# Altium PCB PCI Express_16765X6890_64PIN_Low profile_Clear.PCBDOC (part 8 of 9)
Units mm, origin at the board's own origin, x right, y up, seen from the top; angles counter-clockwise.
Board outline 80.71 x 137.84 mm, 6 copper layers (Top Layer, Layer 2 (GND), Layer 3, Layer 4, Layer 5 (AGND), Bottom Layer), stack 1.571 mm thick; 507 components, 297 nets, 1544 pads, 616 vias.
Unrouted connection lines stored in the file: 101.
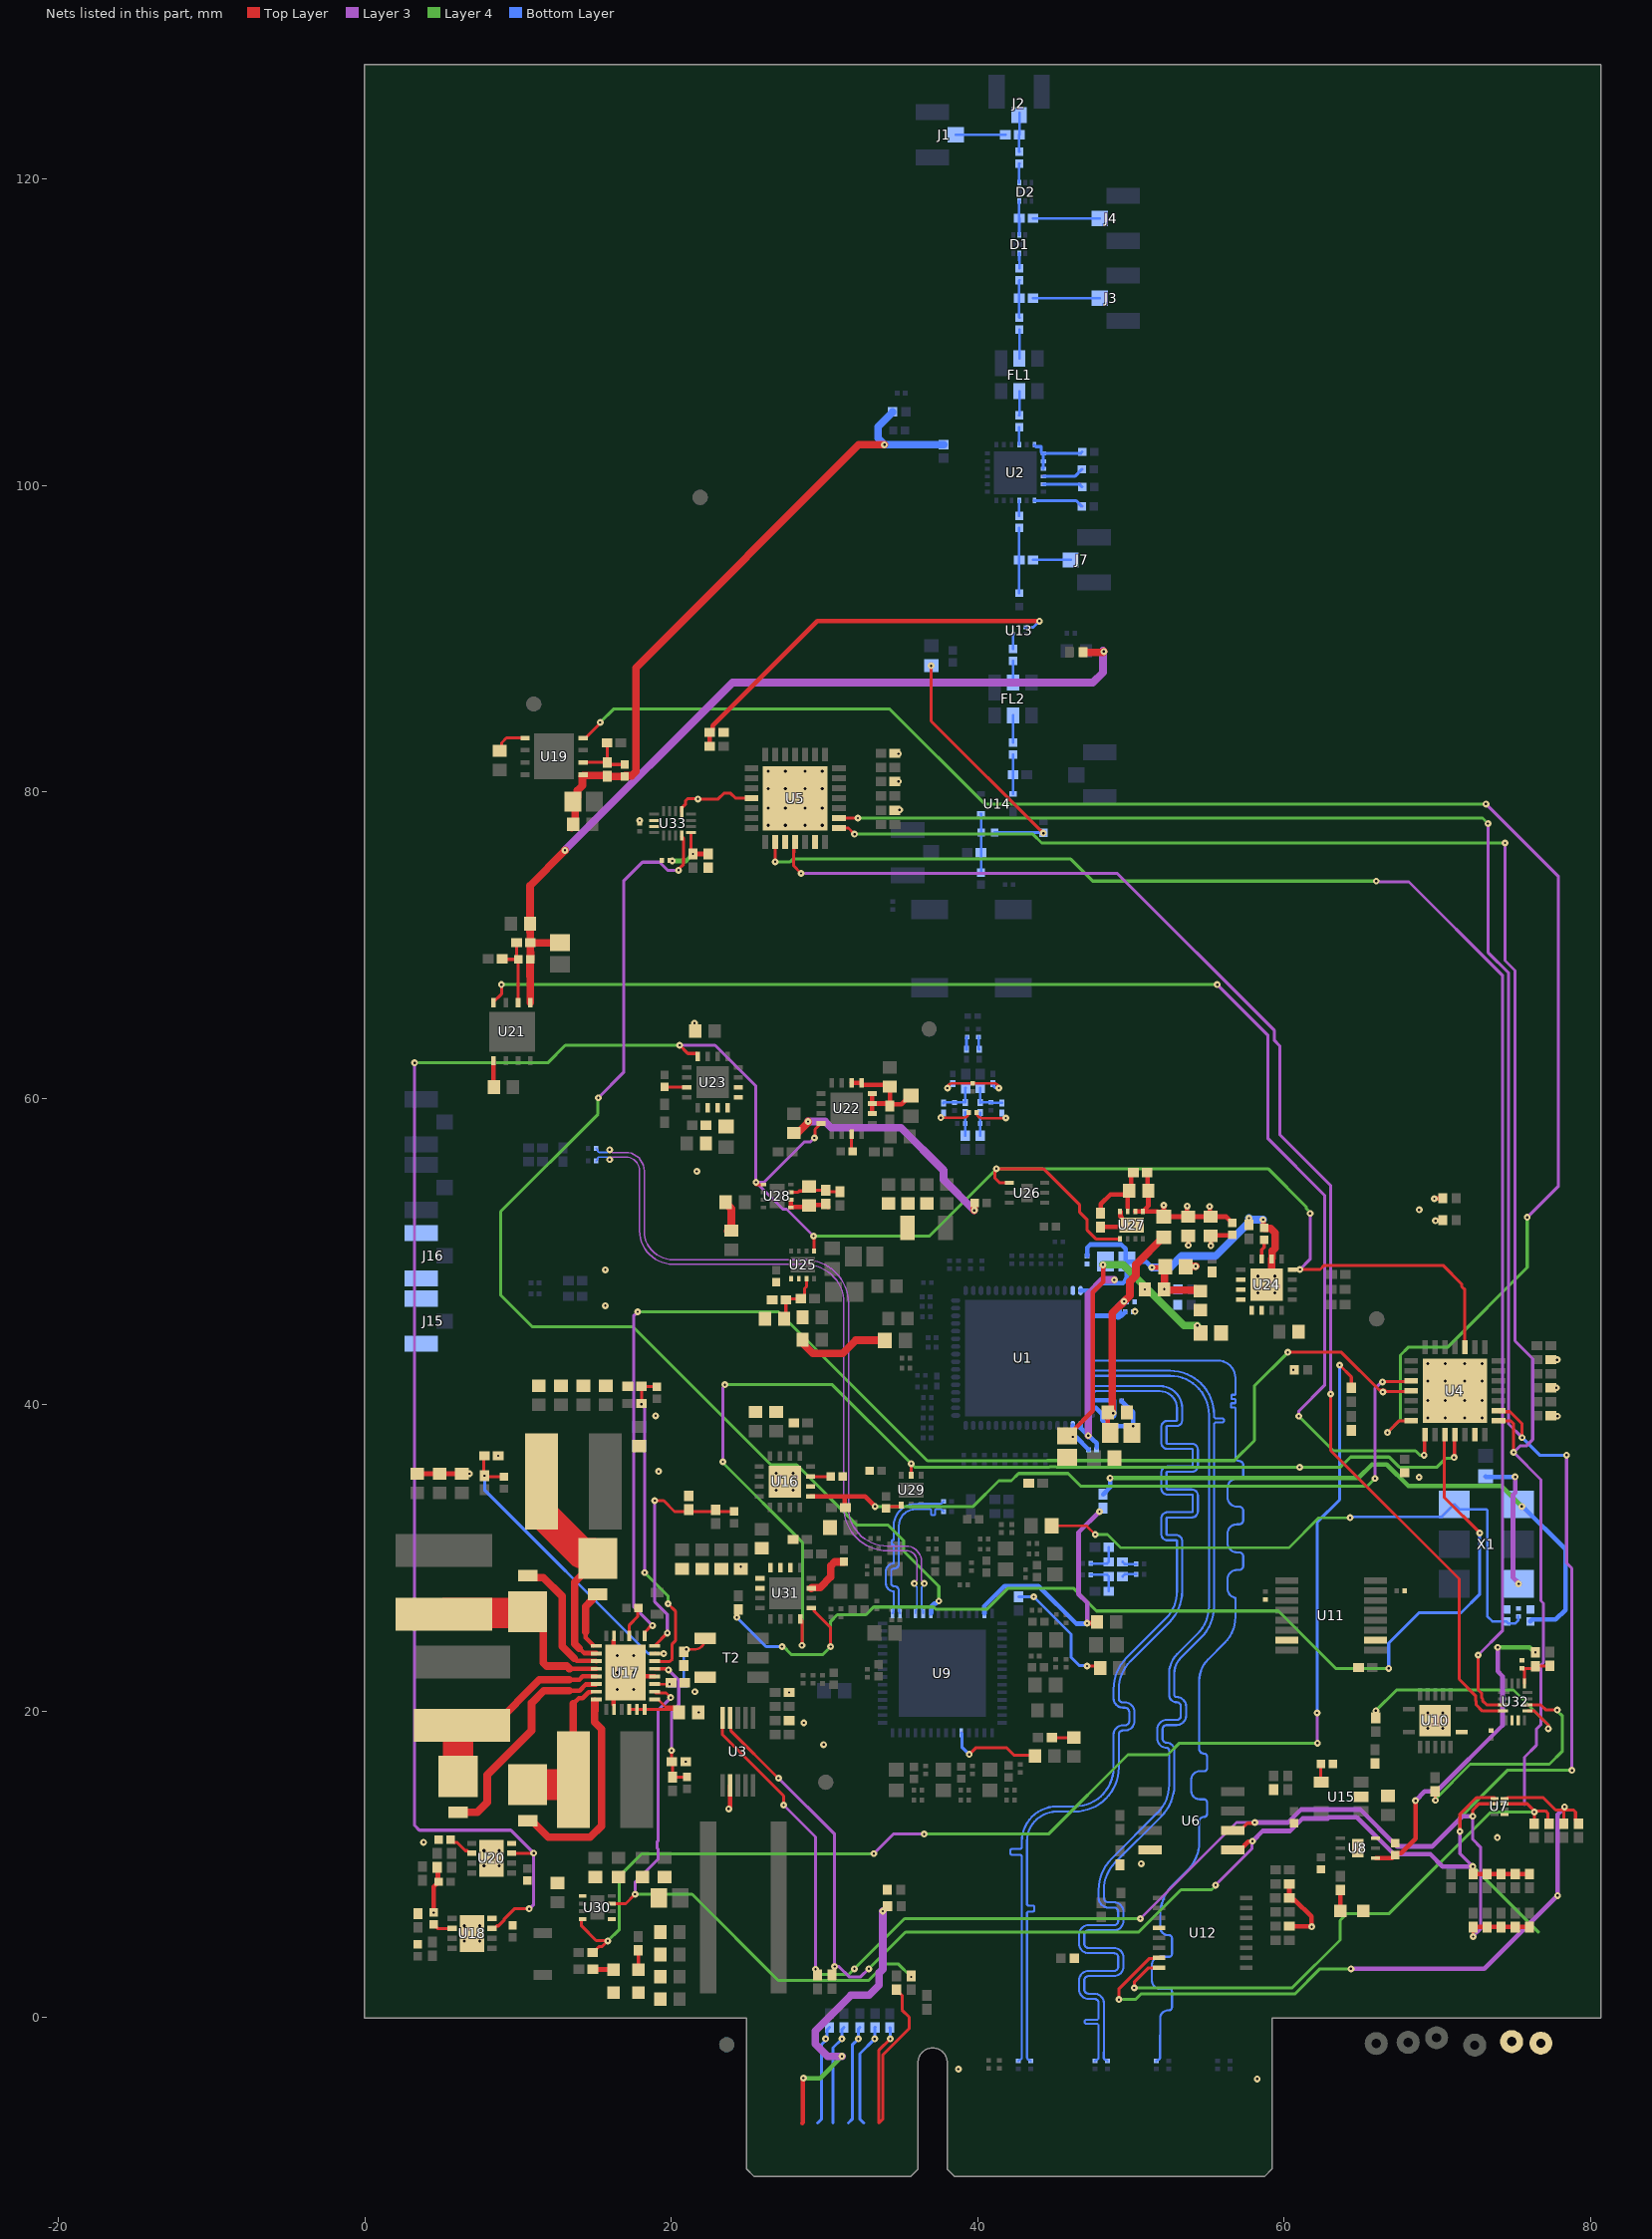
[diagram p6: the nets of this part, all layers, seen from the top]

## Via types
v1: diameter 0.45, hole 0.15, Top Layer to Bottom Layer, 469 vias
v2: diameter 0.5, hole 0.2, Top Layer to Bottom Layer, 128 vias
v3: diameter 0.475, hole 0.15, Top Layer to Bottom Layer, 15 vias
v4: diameter 5, hole 3, Top Layer to Bottom Layer, 3 vias
v5: diameter 0.6, hole 0.2, Top Layer to Bottom Layer, 1 vias

## Nets (pads, with @x,y where several pads share a name; then routed paths per layer and width w, separated by ;. In a path a pad name is that pad's centre, name@x,y a point inside that pad or via, vN(x,y) a via of type N, cw(c..) or ccw(c..) an arc to the next point about the centre after c; other vN are vias at no path point) (continued)
CMLout2_P: C18.1 U1.25 | length 66.1
  Bottom Layer w0.138: U1.25@47.363,42.792 47.499,42.792 ccw(c47.499,42.93) 47.597,42.832 cw(c47.695,42.734) 47.695,42.873 55.679,42.873 cw(c55.679,41.732) 56.82,41.732 56.82,41.238 56.82,40.913 56.82,40.693 cw(c56.765,40.693) 56.765,40.638 56.611,40.638 ccw(c56.611,40.583) 56.556,40.583 56.556,40.418 ccw(c56.611,40.418) 56.611,40.363 56.765,40.363 cw(c56.765,40.308) 56.82,40.308 56.82,40.143 cw(c56.765,40.143) 56.765,40.087 56.585,40.087 ccw(c56.585,40.032) 56.53,40.032 56.53,39.867 ccw(c56.585,39.867) 56.585,39.812 56.765,39.812 cw(c56.765,39.757) 56.82,39.757 56.82,39.675 56.82,36.558 ccw(c57.055,36.558) 57.055,36.322 cw(c57.055,36.043) 57.334,36.043 57.334,35.447 cw(c57.055,35.447) 57.055,35.168 56.922,35.168 ccw(c56.922,34.552) 56.306,34.552 56.306,33.956 ccw(c56.922,33.956) 56.922,33.34 57.055,33.34 cw(c57.055,33.061) 57.334,33.061 57.334,32.465 cw(c57.055,32.465) 57.055,32.186 56.922,32.186 ccw(c56.922,31.57) 56.306,31.57 56.306,30.974 ccw(c56.922,30.974) 56.922,30.358 57.055,30.358 cw(c57.055,30.079) 57.334,30.079 57.334,29.483 cw(c57.055,29.483) 57.055,29.204 56.922,29.204 ccw(c56.922,28.588) 56.306,28.588 56.306,27.991 ccw(c56.922,27.991) 56.82,27.384 56.82,26.137 cw(c54.416,26.137) 56.116,24.437 55.026,23.347 ccw(c56.398,21.975) 54.458,21.975 54.458,17.531 ccw(c54.768,17.531) 54.768,17.221 cw(c54.768,17.017) 54.972,17.017 54.972,16.272 cw(c54.768,16.272) 54.768,16.068 54.485,16.068 ccw(c54.485,15.526) 53.943,15.526 53.943,14.781 ccw(c54.485,14.781) 54.485,14.239 54.768,14.239 cw(c54.768,14.035) 54.972,14.035 54.972,13.289 cw(c54.768,13.289) 54.768,13.085 ccw(c54.768,12.775) 54.458,12.775 54.458,11.435 cw(c51.918,11.435) 53.714,9.639 52.751,8.677 ccw(c54.782,6.646) 51.91,6.646 51.91,5.884 ccw(c52.428,5.884) 52.428,5.366 52.498,5.366 cw(c52.498,5.186) 52.678,5.186 52.678,4.139 cw(c52.498,4.139) 52.498,3.959 51.89,3.959 ccw(c51.89,3.441) 51.373,3.441 51.373,2.394 ccw(c51.89,2.394) 51.89,1.876 52.498,1.876 cw(c52.498,1.696) 52.678,1.696 52.678,0.649 cw(c52.498,0.649) 52.498,0.469 52.428,0.469 ccw(c52.428,-0.049) 51.91,-0.049 51.91,-1.152 51.901,-1.161 51.901,-2.62 cw(c51.764,-2.62) 51.861,-2.717 51.847,-2.731 cw(c51.783,-2.666) 51.783,-2.758 ccw(c51.783,-2.849) 51.718,-2.784 C18.1@51.664,-2.839
CMLout3_N: C233.1 U1.26 | length 66
  Bottom Layer w0.138: U1.26@47.363,42.292 47.557,42.292 47.638,42.21 52.553,42.21 cw(c52.553,39.333) 55.43,39.333 55.43,39.243 55.43,39.188 55.513,39.105 55.996,39.105 56.079,39.023 56.079,38.913 55.996,38.83 55.513,38.83 55.43,38.748 55.43,37.084 55.43,26.831 cw(c52.558,26.831) 54.589,24.8 53.249,23.46 ccw(c54.255,22.454) 52.832,22.454 52.832,21.064 ccw(c52.984,21.064) 52.984,20.912 cw(c52.984,20.295) 53.6,20.295 53.6,19.699 cw(c52.984,19.699) 52.984,19.083 52.342,19.083 ccw(c52.342,18.804) 52.064,18.804 52.064,18.208 ccw(c52.342,18.208) 52.342,17.929 cw(c52.342,17.44) 52.832,17.44 52.832,15.165 cw(c49.96,15.165) 51.991,13.134 48.979,10.122 ccw(c50.775,8.326) 48.235,8.326 48.235,7.791 ccw(c48.513,7.791) 48.513,7.513 48.895,7.513 cw(c48.895,6.896) 49.511,6.896 49.511,6.3 cw(c48.895,6.3) 48.895,5.684 47.237,5.684 ccw(c47.237,5.405) 46.958,5.405 46.958,4.809 ccw(c47.237,4.809) 47.237,4.53 48.895,4.53 cw(c48.895,3.914) 49.511,3.914 49.511,3.318 cw(c48.895,3.318) 48.895,2.702 47.237,2.702 ccw(c47.237,2.423) 46.958,2.423 46.958,1.827 ccw(c47.237,1.827) 47.237,1.548 47.618,1.548 cw(c47.618,0.932) 48.235,0.932 48.235,-2.269 48.226,-2.278 48.226,-2.62 ccw(c48.363,-2.62) 48.266,-2.717 48.279,-2.731 ccw(c48.344,-2.666) 48.344,-2.758 cw(c48.344,-2.849) 48.409,-2.784 C233.1@48.463,-2.839
CMLout3_P: C234.1 U1.27 | length 66
  Bottom Layer w0.138: U1.27@47.363,41.792 47.557,41.792 47.638,41.873 52.553,41.873 cw(c52.553,39.333) 55.093,39.333 55.093,26.833 cw(c52.553,26.833) 54.349,25.037 53.008,23.697 ccw(c54.249,22.456) 52.494,22.456 52.494,21.064 ccw(c52.984,21.064) 52.984,20.574 cw(c52.984,20.295) 53.263,20.295 53.263,19.699 cw(c52.984,19.699) 52.984,19.42 52.342,19.42 ccw(c52.342,18.804) 51.726,18.804 51.726,18.208 ccw(c52.342,18.208) 52.342,17.592 cw(c52.342,17.44) 52.494,17.44 52.494,15.167 cw(c49.954,15.167) 51.75,13.371 48.738,10.359 ccw(c50.769,8.328) 47.897,8.328 47.897,7.791 ccw(c48.513,7.791) 48.513,7.175 48.895,7.175 cw(c48.895,6.896) 49.173,6.896 49.173,6.3 cw(c48.895,6.3) 48.895,6.021 47.237,6.021 ccw(c47.237,5.405) 46.621,5.405 46.621,4.809 ccw(c47.237,4.809) 47.237,4.193 48.895,4.193 cw(c48.895,3.914) 49.173,3.914 49.173,3.318 cw(c48.895,3.318) 48.895,3.039 47.237,3.039 ccw(c47.237,2.423) 46.621,2.423 46.621,1.827 ccw(c47.237,1.827) 47.237,1.21 47.618,1.21 cw(c47.618,0.932) 47.897,0.932 47.897,0.102 47.897,-0.064 47.814,-0.146 47.066,-0.146 46.983,-0.229 46.983,-0.339 47.066,-0.421 47.814,-0.421 47.897,-0.504 47.897,-0.559 47.897,-2.13 47.888,-2.139 47.888,-2.62 cw(c47.75,-2.62) 47.848,-2.717 47.834,-2.731 cw(c47.77,-2.666) 47.77,-2.758 ccw(c47.77,-2.849) 47.705,-2.784 C234.1@47.65,-2.839
CMLout4_N: C235.1 U1.28 | length 66.1
  Bottom Layer w0.138: C235.1@43.459,-2.839 43.405,-2.784 ccw(c43.34,-2.849) 43.34,-2.758 cw(c43.34,-2.666) 43.276,-2.731 43.262,-2.717 cw(c43.359,-2.62) 43.222,-2.62 43.222,2.404 43.217,2.408 43.217,5.512 43.217,6.788 cw(c43.335,6.788) 43.335,6.906 43.58,6.906 ccw(c43.58,7.023) 43.697,7.023 43.697,7.18 ccw(c43.58,7.18) 43.58,7.297 43.335,7.297 cw(c43.335,7.415) 43.217,7.415 43.217,7.493 43.217,11.493 cw(c45.161,11.493) 45.161,13.437 46.33,13.437 ccw(c46.33,16.314) 49.207,16.314 49.207,18.466 cw(c49.469,18.466) 49.469,18.727 49.613,18.727 ccw(c49.613,19.343) 50.229,19.343 50.229,19.94 ccw(c49.613,19.94) 49.613,20.556 49.486,20.556 cw(c49.486,20.835) 49.207,20.835 49.207,21.434 cw(c51.747,21.434) 49.951,23.23 52.506,25.785 ccw(c50.476,27.816) 53.347,27.816 53.347,31.089 ccw(c52.955,31.089) 52.955,31.481 52.38,31.481 cw(c52.38,31.536) 52.325,31.536 52.325,32.58 cw(c52.38,32.58) 52.38,32.635 53.977,32.635 ccw(c53.977,33.027) 54.37,33.027 54.37,34.071 ccw(c53.977,34.071) 53.977,34.463 52.38,34.463 cw(c52.38,34.518) 52.325,34.518 52.325,35.562 cw(c52.38,35.562) 52.38,35.617 53.977,35.617 ccw(c53.977,36.009) 54.37,36.009 54.37,37.053 ccw(c53.977,37.053) 53.977,37.446 52.38,37.446 cw(c52.38,37.5) 52.325,37.5 52.325,38.544 cw(c52.38,38.544) 52.38,38.599 52.955,38.599 ccw(c52.955,38.992) 53.347,38.992 53.347,39.751 ccw(c51.888,39.751) 51.888,41.21 47.695,41.21 cw(c47.695,41.349) 47.597,41.251 ccw(c47.499,41.153) 47.499,41.292 U1.28@47.363,41.292
CMLout4_P: C236.1 U1.29 | length 66.1
  Bottom Layer w0.138: C236.1@42.647,-2.839 42.701,-2.784 cw(c42.766,-2.849) 42.766,-2.758 ccw(c42.766,-2.666) 42.83,-2.731 42.844,-2.717 ccw(c42.747,-2.62) 42.884,-2.62 42.875,2.388 42.88,2.392 42.88,10.414 42.88,10.492 ccw(c42.762,10.492) 42.762,10.61 42.252,10.61 cw(c42.252,10.727) 42.135,10.727 42.135,10.884 cw(c42.252,10.884) 42.252,11.001 42.762,11.001 ccw(c42.762,11.119) 42.88,11.119 42.88,11.176 42.88,11.493 cw(c45.161,11.493) 45.161,13.774 46.33,13.774 ccw(c46.33,16.314) 48.87,16.314 48.87,18.466 cw(c49.469,18.466) 49.469,19.065 49.613,19.065 ccw(c49.613,19.343) 49.892,19.343 49.892,19.94 ccw(c49.613,19.94) 49.613,20.218 49.486,20.218 cw(c49.486,20.835) 48.87,20.835 48.87,21.437 cw(c51.741,21.437) 49.711,23.467 52.266,26.022 ccw(c50.47,27.818) 53.01,27.818 53.01,31.089 ccw(c52.955,31.089) 52.955,31.143 52.38,31.143 cw(c52.38,31.536) 51.988,31.536 51.988,32.58 cw(c52.38,32.58) 52.38,32.972 53.977,32.972 ccw(c53.977,33.027) 54.032,33.027 54.032,34.071 ccw(c53.977,34.071) 53.977,34.126 52.38,34.126 cw(c52.38,34.518) 51.988,34.518 51.988,35.562 cw(c52.38,35.562) 52.38,35.954 53.977,35.954 ccw(c53.977,36.009) 54.032,36.009 54.032,37.053 ccw(c53.977,37.053) 53.977,37.108 52.38,37.108 cw(c52.38,37.5) 51.988,37.5 51.988,38.544 cw(c52.38,38.544) 52.38,38.937 52.955,38.937 ccw(c52.955,38.992) 53.01,38.992 53.01,39.751 ccw(c51.888,39.751) 51.888,40.873 47.695,40.873 ccw(c47.695,40.734) 47.597,40.832 cw(c47.499,40.93) 47.499,40.792 U1.29@47.363,40.792
CTRL_VCXO: C222.1 R89.1 U9.41 | length 17.5
  Top Layer w0.3: v1(47.142,25.73) 47.706,25.73 C222.1@47.784,25.808
  Layer 3 w0.3: v1(47.142,25.73) 47.142,27.065 46.582,27.626 46.582,31.647 v1(47.955,33.02)
  Bottom Layer w0.3: U9.41@40.437,26.372 40.437,26.848 41.746,28.157 43.979,28.157 46.457,25.679 46.479,25.702 47.114,25.702 v1(47.142,25.73)
DCDC_PG1: U4.25 U17.23 | length 82.8
  Top Layer w0.2: U17.23@18.26,24.905 18.26,25.13 18.707,25.578 v1(18.771,25.578) ; v1(60.249,43.409) 63.748,43.409 66.204,40.953 v1@66.573,40.953 ; v1(66.446,40.818) 66.484,40.856 68.257,40.856 U4.25@68.295,40.894
  Layer 3 w0.2: v1(17.805,46.05) 17.534,45.779 17.534,26.814 v1(18.771,25.578)
  Layer 4 w0.2: v1(17.805,46.05) 27,46.05 36.72,36.33 44.522,36.33 44.539,36.347 56.756,36.347 58.064,37.656 58.064,41.224 v1(60.249,43.409) ; v1(18.771,25.578) v1@18.807,25.614
DCDC_PG2: R83.1 R136.2 U30.8 | length 84.9
  Top Layer w0.2: U30.8@14.214,6.425 14.17,6.425 14.145,6.4 14.145,5.978 15.101,5.023 15.827,5.023 v1(15.855,4.994) 15.484,4.623 15.289,4.623 14.908,4.242 R83.1@14.858,4.242 R83.1@14.883,4.217 ; v1(63.627,42.57) 64.389,41.808 R136.2@64.389,41.09
  Layer 3 w0.2: v1(33.223,10.693) 34.493,11.963 v1(36.5,11.963) ; v1(62.154,19.872) 62.166,19.859 62.166,17.92 v1(62.179,17.907)
  Layer 4 w0.2: v1@15.768,4.907 v1(15.855,4.994) 16.612,5.75 16.612,9.22 18.059,10.668 33.198,10.668 v1(33.223,10.693) ; v1(36.5,11.963) 44.622,11.963 49.804,17.145 52.4,17.145 53.162,17.907 v1(62.179,17.907)
  Bottom Layer w0.2: v1(62.154,19.872) 62.154,32.315 63.627,33.788 v1(63.627,42.57)
DGND: C85.1 C86.1 C87.1 C88.1 C89.1 C90.1 C91.1 FB35.2 R70.1 U1.16 U1.33 U24.6 U24.17 | length 42.7
  Top Layer w0.3: v1(51.373,48.946) 52.182,48.946 52.197,48.961 FB35.2@52.233,48.997 ; R70.1@57.709,51.725 v1(57.709,52.172) ; v1(58.623,52.07) 58.652,52.041 58.652,51.568 C87.1@58.699,51.52
  Top Layer w0.5: FB35.2@52.197,48.961 52.197,47.559 v1(52.179,47.541) C86.1@52.162,47.523 52.217,47.468 54.478,47.468 C85.1@54.534,47.412 ; C87.1@58.699,51.52 58.699,51.515 58.719,51.495 59.126,51.495 59.419,51.202 59.419,50.209 59.227,50.016 59.227,49.553 U24.6@59.177,49.503 59.177,48.153 U24.17@58.852,47.828
  Layer 3 w0.5: v1(47.219,37.973) 47.219,47.183 48.178,48.142 v1(48.918,48.142)
  Bottom Layer w0.3: U1.33@46.713,38.642 46.713,38.492 46.741,38.463 46.741,38.45 v1(47.219,37.973) 47.777,37.49 C88.1@47.777,37.206 ; U1.16@46.713,47.442 47.391,47.442 47.879,47.93 49.479,47.93 49.657,48.108 49.657,48.173 49.736,48.252 C90.1@49.736,49.352 ; C89.1@47.142,49.694 47.152,49.694 47.152,50.251 47.346,50.444 49.378,50.444 49.657,50.165 49.657,49.431 C90.1@49.736,49.352 ; v1(51.373,48.946) 50.992,49.327 49.762,49.327 C90.1@49.736,49.352
  Bottom Layer w0.5: v1(51.373,48.946) 52.565,48.946 53.317,49.697 54.509,49.697 54.512,49.693 55.499,49.693 57.709,51.903 v1(57.709,52.172) 57.81,52.07 v1(58.623,52.07)
  other v2: 58.302,47.278 59.402,47.278 58.302,48.378 59.402,48.378
DRGND: C127.1 C128.1 C129.1 C130.1 C132.1 C133.1 C134.1 C135.1 FB5.1 FB6.1 FB7.1 FB8.1 FB9.1 FB35.1 FB36.1 R74.1 U1.18 U1.31 U27.4 U27.9 | length 13.4
  Top Layer w0.3: R74.1@48.017,51.587 49.911,51.587 v1(50.038,51.714) 49.738,51.714 49.388,52.064 49.388,52.219 49.313,52.294 49.313,52.589 U27.4@49.288,52.614 ; v1(53.746,50.394) 53.746,51.01 C129.1@53.749,51.012 ; v1(55.22,50.368) 55.22,51.006 C130.1@55.213,51.012 55.246,51.046 56.583,51.046 C128.1@56.617,51.079 ; v1(69.799,53.442) 69.817,53.46 70.34,53.46 FB7.1@70.358,53.478 ; v1(69.875,51.994) 69.899,52.017 70.334,52.017 FB8.1@70.358,52.041
  Top Layer w0.5: FB35.1@53.583,48.997 53.609,49.022 v1(54.229,49.022)
  Bottom Layer w0.3: U1.31@47.363,39.792 47.72,39.792 48.133,39.379 48.133,38.97 48.52,38.583 v1(50.14,38.583) 50.14,39.493 49.409,40.224 C134.1@49.409,40.234
  other v1: 60.604,42.266 50.267,46.076 68.817,52.71
DRVDD_1.25V: C127.2 C132.2 C133.2 C134.2 C135.2 FB14.2 U1.19 U1.30 | length 20.2
  Top Layer w0.3: C127.2@48.483,39.497 48.483,38.32 C135.2@48.652,38.151
  Top Layer w0.5: C127.2@48.786,39.519 48.786,45.966 v1(49.555,46.736) 49.94,47.121 49.94,48.038 50.325,48.423 50.325,49.141 52.096,50.912 FB14.2@52.146,50.912
  Bottom Layer w0.3: U1.30@47.363,40.292 48.785,40.292 C134.2@48.854,40.361 ; U1.19@47.363,45.792 49.174,45.792 49.367,45.792 49.616,46.04 49.626,46.04 C133.2@49.626,46.05 ; C134.2@48.809,40.234 C134.2@48.889,40.234
  Bottom Layer w0.5: v1@48.809,39.324 C134.2@48.809,40.234 ; 49.174,45.792 49.174,46.355 v1(49.555,46.736)
  other v1: 48.844,39.446
DVDD_1.25V: C86.2 C88.2 C89.2 C90.2 C91.2 FB12.2 U1.15 U1.34 | length 22
  Top Layer w0.3: v1(46.203,37.897) 46.203,38.281 47.513,39.592 47.513,47.335 48.184,48.006 v1(48.184,49.124)
  Layer 4 w0.5: v1(48.184,49.124) 49.494,49.124 53.456,45.161 v1(54.331,45.161)
  Bottom Layer w0.3: U1.34@46.213,38.642 46.213,37.932 46.203,37.922 v1(46.203,37.897) 46.231,37.868 46.438,37.868 47.238,37.069 C88.2@47.238,37.059
  other v1: 50.912,47.523
EN_04610: U4.4 U29.2 U31.4 | length 73.9
  Top Layer w0.2: U31.4@28.432,26.011 28.524,25.919 v1(28.524,24.282) ; U29.2@35.662,35.392 v1(35.662,36.144) ; v1(71.095,36.551) 71.12,36.576 71.12,38.019 U4.4@71.145,38.044
  Layer 3 w0.2: v1(23.368,36.271) 23.368,41.106 23.495,41.233 v1(23.495,41.3)
  Layer 4 w0.2: v1(23.368,36.271) 23.368,36.204 23.364,36.199 28.557,31.006 28.557,24.316 v1(28.524,24.282) ; v1(23.495,41.3) 30.505,41.3 v1(35.662,36.144) 35.89,35.916 44.673,35.916 44.69,35.933 45.125,35.933 45.142,35.916 v1(61.011,35.916) 63.678,35.916 64.338,36.576 66.854,36.576 67.515,35.916 69.983,35.916 70.57,36.503 71.047,36.503 v1(71.095,36.551)
EN_9690_Power: U4.17 U18.3 U20.3 U22.4 U23.4 U24.4 U25.5 U26.4 U27.5 U28.5 | length 178.3
  Top Layer w0.2: U18.3@8.301,5.804 8.426,5.804 8.601,5.979 8.725,5.979 9.08,6.333 9.08,6.407 9.76,7.088 v1(10.731,7.088) ; U20.3@9.574,10.712 11.007,10.712 v1(11.019,10.725) ; v1(20.549,63.449) 21.082,62.916 21.667,62.916 21.717,62.866 U23.4@21.717,62.716 ; v1@25.527,54.36 26.004,54.36 U28.5@26.008,54.365 ; v1(29.286,51.003) 29.306,50.984 29.306,50.043 U25.5@29.325,50.024 ; v1(29.337,57.404) 29.38,57.447 29.38,57.964 U22.4@29.764,58.349 ; U26.4@42.069,54.469 41.442,54.469 41.123,54.788 41.123,55.296 v1(41.224,55.397) 44.29,55.397 46.66,53.027 46.66,52.553 47.15,52.062 47.15,51.38 47.716,50.814 U27.5@49.288,50.814 ; v1(61.036,48.819) 62.357,48.819 62.627,49.089 70.374,49.089 71.596,47.867 71.596,47.701 71.795,47.502 U4.17@71.795,43.744
  Layer 3 w0.2: v1(3.251,62.306) 3.251,12.525 3.557,12.219 9.525,12.219 v1(11.019,10.725) 11.019,7.377 v1(10.731,7.088) ; v1(20.549,63.449) 22.86,63.449 25.527,60.782 v1(25.527,54.508) ; v1(29.286,51.003) 27.534,52.756 27.28,52.756 v1(25.527,54.508) ; v1(29.337,57.404) 29.089,57.156 28.694,57.156 26.047,54.508 v1(25.527,54.508) ; v1(61.036,48.819) 61.697,49.479 v1(61.697,52.476)
  Layer 4 w0.2: v1(3.251,62.306) 11.938,62.306 13.081,63.449 v1(20.549,63.449) ; v1(29.286,51.003) 36.855,51.003 v1@41.25,55.397 ; v1(41.224,55.397) v1@41.25,55.397 ; v1(61.697,52.476) 61.697,52.544 61.443,52.798 61.443,52.908 58.953,55.397 v1@41.25,55.397
EN_DCDC: R42.2 U17.16 U30.3 | length 38.1
  Top Layer w0.2: U30.3@16.114,7.425 16.117,7.428 17.025,7.428 v1(17.635,8.038) ; U17.16@18.91,21.255 18.985,21.18 19.663,21.18 v1(19.964,20.879) ; v1(35.662,2.642) R42.2@35.662,2.711
  Layer 3 w0.2: v1(17.635,8.038) 17.635,8.821 19.126,10.312 19.126,10.992 19.084,11.035 19.084,11.47 19.126,11.512 19.126,20.041 v1(19.964,20.879)
  Layer 4 w0.2: v1(17.635,8.038) 21.364,8.038 27,2.402 32.863,2.402 33.96,3.499 34.804,3.499 v1(35.662,2.642)
EN_LNA: R30.1 R33.2 U13.6 | length 26.7
  Top Layer w0.3: R30.1@22.512,82.956 R33.2@22.512,83.871 22.562,83.871 22.712,84.021 22.712,84.316 29.53,91.135 v1(44.03,91.135)
  Bottom Layer w0.2: U13.6@43.109,90.729 43.625,90.729 v1(44.03,91.135)
EN_PWR_RF_2.8: U4.1 U21.8 | length 90.5
  Top Layer w0.2: U21.8@8.401,66.238 8.382,66.257 8.915,66.791 v1(8.915,67.412) ; v1(69.139,36.703) 69.167,36.731 69.167,38.016 U4.1@69.195,38.044
  Layer 3 w0.2: v1(55.635,67.412) 58.953,64.093 58.953,57.353 62.643,53.664 62.643,41.256 60.96,39.573 v1(60.96,39.243)
  Layer 4 w0.2: v1(8.915,67.412) v1(55.635,67.412) ; v1(60.96,39.243) 63.221,36.982 68.58,36.982 68.859,36.703 v1(69.139,36.703)
EN_PWR_RF_5: U4.28 U19.8 | length 113.3
  Top Layer w0.2: U19.8@14.251,83.511 14.401,83.511 15.355,84.464 v1(15.355,84.525) ; v1(66.751,38.176) 67.519,38.944 U4.28@68.295,38.944
  Layer 3 w0.2: v1(73.177,79.197) 77.91,74.464 77.91,54.263 v1(75.87,52.222)
  Layer 4 w0.2: v1(15.355,84.525) 16.225,85.395 34.265,85.395 40.462,79.197 v1(73.177,79.197) ; v1(66.751,38.176) 67.589,39.014 67.589,43.231 68.097,43.739 70.663,43.739 75.87,48.946 v1(75.87,52.222)
EN_TRANSLATOR_2.5_1.8: R145.2
GND: C33.1 C34.1 C35.1 C36.1 C37.1 C38.1 C39.1 C40.2 C41.2 C42.2 C43.2 C45.1 C46.1 C47.1 C48.1 C51.1 C52.1 C53.1 C54.1 C56.1 C57.1 C58.1 C59.1 C60.1 C62.1 C63.1 C64.1 C65.1 C69.1 C70.1 C76.1 C80.1 C81.1 C94.1 C112.1 C131.1 C147.1 C148.1 C149.1 C168.1 C230.1 C231.1 C237.1 C238.1 C239.1 C240.2 C241.1 C242.2 C243.2 C244.2 D7.2 D8.2 D9.2 FB31.1 FB32.1 FB33.1 FB34.1 J15.1 J15.3 J16.1 J16.3 R20.1 R33.1 R41.1 R51.1 R53.1 R55.2 R57.1 R58.2 R60.2 R81.1 R85.1 R116.1 R117.1 R118.1 R119.1 R120.1 R121.1 R122.1 R129.2 R130.2 R137.1 R141.1 R142.1 R143.1 R146.1 R148.1 T2.5 U3.7 U4.6 U4.29 U5.6 U5.29 U6.4 U7.1 U8.3 U8.7 U10.7 U10.15 U11.7 U11.10 U12.4 U15.2 U16.6 U16.17 U17.10 U17.18 U17.27 U17.29 U18.4 U18.9 U20.4 U20.9 U30.1 U30.5 U32.6 U32.7 U33.6 U33.7 | length 56.4
  Top Layer w0.3: C58.1@3.422,35.486 C57.1@4.883,35.486 C56.1@6.323,35.486 ; v1(4.494,6.843) 4.494,8.528 4.818,8.851 C70.1@4.823,8.851 4.768,8.906 4.768,9.745 R85.1@4.713,9.8 ; U17.10@16.235,20.434 16.235,21.731 U17.29@17.01,22.505 ; U17.27@16.235,24.577 16.235,23.28 U17.29@17.01,22.505 ; U17.18@18.91,22.255 18.885,22.28 17.01,22.28 U17.29@17.01,22.505 ; v1(23.749,13.614) 23.749,13.655 23.845,13.751 U3.7@23.845,15.148 ; 28.559,-6.888 28.597,-6.85 28.597,-3.991 v1(28.626,-3.962) ; R143.1@60.343,5.969 60.369,5.944 61.773,5.944 61.778,5.949 61.778,6.593 60.724,7.648 60.486,7.648 R142.1@60.336,7.798 60.34,7.801 60.34,8.709 R141.1@60.343,8.712
  Top Layer w0.5: C147.1@23.553,53.199 23.553,53.149 23.919,52.784 C112.1@23.919,51.349 ; C112.1@23.673,51.308 C112.1@23.725,51.432 ; C76.1@28.003,57.724 28.239,57.724 28.931,58.415 v1(28.931,58.471) ; v1(39.776,52.68) 39.776,53.152 C94.1@39.793,53.169 ; C81.1@60.935,44.705 C81.1@60.935,44.755
  Layer 3 w0.5: v1(28.931,58.471) 30.048,58.471 30.445,58.074 34.991,58.074 37.775,55.29 37.775,54.681 v1(39.776,52.68) ; v1(31.14,-2.54) 30.209,-2.54 29.399,-1.729 29.399,-0.882 31.728,1.447 32.913,1.447 33.568,2.102 33.568,2.9 33.807,3.139 v1(33.807,6.934)
  Layer 4 w0.3: v1(28.626,-3.962) 29.718,-3.962 v1(31.14,-2.54)
  other v1: 58.242,-4.013 38.74,-3.378 61.798,5.918 50.673,10.033 3.835,11.43 73.914,11.735 20.941,16.688 29.947,17.805 28.651,19.228 21.793,19.914 27.686,21.209 21.539,21.26 24.536,29.421 68.809,35.255 6.833,35.484 19.177,35.636 8.705,36.652 77.851,39.243 18.974,39.268 77.775,41.097 77.826,42.926 15.697,46.457 15.697,48.793 21.666,55.22 21.514,64.897 17.932,78.115 34.9,78.816 34.823,80.67 34.823,82.474
  other v2: 6.501,4.979 7.501,4.979 6.501,5.979 7.501,5.979 7.774,9.887 8.774,9.887 7.774,10.887 8.774,10.887 69.367,18.879 70.367,18.879 69.367,19.879 70.367,19.879 16.46,21.405 17.56,21.405 16.46,22.505 17.56,22.505 16.46,23.605 17.56,23.605 26.858,34.421 27.958,34.421 26.858,35.521 27.958,35.521 69.375,39.124 70.51,39.124 71.78,39.124 72.915,39.124 69.375,40.259 70.51,40.259 71.78,40.259 72.915,40.259 69.375,41.529 70.51,41.529 71.78,41.529 72.915,41.529 69.375,42.664 70.51,42.664 71.78,42.664 72.915,42.664 26.314,77.808 27.449,77.808 28.719,77.808 29.854,77.808 26.314,78.943 27.449,78.943 28.719,78.943 29.854,78.943 26.314,80.213 27.449,80.213 28.719,80.213 29.854,80.213 26.314,81.348 27.449,81.348 28.719,81.348 29.854,81.348
GND_VCXO: C177.1 C209.1 C210.1 FB29.1 X1.3 | length 9.1
  Layer 3 w0.3: v1(75.082,35.281) 75.082,34.248 74.939,34.104 74.939,28.708 75.311,28.336 v1(75.311,28.296)
  Bottom Layer w0.3: FB29.1@73.152,35.317 73.188,35.281 v1(75.082,35.281)
I2C0_SCL: R17.2 R28.2 R29.2 R34.2 R47.2 R128.1 TP2.1 U3.5 U4.8 U5.8 U6.6 U7.6 | length 196.9
  Top Layer w0.2: U3.5@23.345,19.548 23.345,18.447 27.332,14.46 v1(27.332,13.867) ; U5.8@30.934,77.628 31.562,77.628 v1(31.962,77.228) ; U6.6@56.652,12.204 57.127,12.204 57.601,12.678 58.042,12.678 v1(58.09,12.725) ; v1(72.314,13.132) 72.314,13.538 72.72,13.945 U7.6@73.727,13.945 ; v1(72.339,5.283) R28.2@72.339,5.9 ; U4.8@73.995,38.944 74.772,38.944 74.981,38.735 v1(74.981,36.881)
  Top Layer w0.3: R28.2@72.339,5.9 R29.2@73.254,5.9 R34.2@74.168,5.9 R17.2@75.082,5.9 R128.1@76.022,5.9
  Layer 3 w0.2: v1(27.332,13.867) 29.413,11.786 v1(29.413,3.15) ; v1(50.622,6.452) 56.896,12.725 v1(58.09,12.725) ; v1(72.314,13.132) 72.314,11.613 72.839,11.088 72.839,5.783 v1(72.339,5.283) ; v1(74.422,76.657) 74.422,68.975 75.065,68.331 75.065,44.156 76.225,42.996 76.225,37.719 75.802,37.296 75.396,37.296 v1(74.981,36.881) 76.767,35.094 76.767,27.189 76.928,27.028 76.928,23.152 76.767,22.991 76.767,19.115 76.462,18.81 76.462,17.752 75.692,16.981 75.692,13.888
  Layer 3 w0.3: v1(58.09,12.725) 60.249,12.725 61.095,13.572 64.965,13.572 67.377,11.16 69.656,11.16 71.628,13.132 v1(72.314,13.132)
  Layer 4 w0.2: v1(29.413,3.15) 29.461,3.15 29.808,2.802 31.581,2.802 v1(31.953,3.175) 35.23,6.452 v1(50.622,6.452) ; v1(31.962,77.228) 43.605,77.228 44.176,76.657 v1(74.422,76.657)
I2C0_SCL_2.5V: R37.1 R126.1 U7.3 U12.8 | length 38.6
  Top Layer w0.2: v1(50.216,1.93) 50.216,2.308 51.145,3.237 U12.8@51.836,3.237 ; U7.3@74.397,13.945 75.866,13.945 v1@76.327,13.484 ; R37.1@76.327,12.642 v1(76.327,13.411) v1@76.327,13.484 ; R126.1@77.292,12.642 77.216,12.718 77.216,13.335 77.067,13.484 v1@76.327,13.484
  Layer 4 w0.2: v1(50.216,1.93) 60.528,1.93 63.652,5.055 63.652,6.325 64.11,6.782 66.87,6.782 73.499,13.411 v1(76.327,13.411)
I2C0_SDA: R18.2 R31.2 R32.2 R35.2 R45.2 R127.1 TP1.1 U3.4 U4.9 U5.9 U6.5 U7.5 | length 205.6
  Top Layer w0.2: U3.4@23.845,19.548 23.895,19.498 23.895,18.698 26.973,15.621 v1(27,15.621) ; R45.2@30.48,2.772 30.658,2.95 v1(30.658,3.327) ; U5.9@30.934,78.278 v1(32.182,78.278) ; v1(71.476,12.141) 71.476,13.266 72.555,14.345 U7.5@73.727,14.345 ; v1(72.314,9.855) 72.314,9.391 R31.2@72.339,9.365 ; U4.9@73.995,39.594 74.053,39.536 74.745,39.536 75.54,38.742 v1(75.54,37.846)
  Top Layer w0.3: U6.5@56.652,10.934 57.127,10.934 57.671,11.478 57.909,11.478 v1(57.937,11.506) ; R31.2@72.339,9.365 R35.2@73.254,9.365 R18.2@74.168,9.365 R127.1@75.082,9.365 R32.2@76.022,9.365
  Layer 3 w0.2: v1(27,15.621) 30.658,11.963 v1(30.658,3.327) 30.932,3.327 31.609,2.65 32.368,2.65 v1(32.893,3.175) ; v1(55.524,8.636) 57.89,11.001 57.89,11.458 v1(57.937,11.506) ; v1(71.476,12.141) 71.476,10.693 v1(72.314,9.855) ; v1(73.304,77.927) 73.304,69.527 74.646,68.185 74.646,38.739 v1(75.54,37.846) ; v1(78.435,36.703) 78.435,29.667 78.782,29.32 v1@78.782,16.197
  Layer 3 w0.3: v1(57.937,11.506) 58.602,12.17 60.401,12.17 61.214,12.983 62.851,12.983 62.939,13.072 64.758,13.072 67.17,10.66 69.545,10.66 70.35,9.855 v1(72.314,9.855)
  Layer 4 w0.2: v1(32.182,78.278) 72.954,78.278 v1(73.304,77.927) ; v1(32.893,3.175) 35.289,5.571 50.514,5.571 53.274,8.331 55.27,8.331 55.524,8.585 v1(55.524,8.636) ; v1(71.476,12.141) 71.476,13.036 74.569,16.129 v1(78.791,16.129) ; v1(72.314,9.855) 76.606,5.563
  Bottom Layer w0.2: v1(75.54,37.846) 76.683,36.703 v1(78.435,36.703)
I2C0_SDA_2.5V: R19.1 R38.1 U7.4 U12.7 | length 48.4
  Top Layer w0.2: v1(49.225,1.168) 49.225,1.883 51.179,3.837 51.786,3.837 U12.7@51.836,3.887 ; U7.4@74.397,14.295 74.543,14.295 74.593,14.345 76.918,14.345 77.724,13.538 78.14,13.538 ; R19.1@78.257,12.642 78.257,13.421 78.14,13.538 ; R38.1@79.223,12.642 79.023,12.842 79.023,13.408 78.892,13.538 78.14,13.538
  Layer 3 w0.3: v1(64.364,3.175) 73.076,3.175 v1(77.851,7.95) 77.851,13.244 78.308,13.701 v1(78.308,13.741)
  Layer 4 w0.2: v1(49.225,1.168) 50.292,1.168 50.654,1.53 60.694,1.53 62.338,3.175 v1(64.364,3.175)
JTAG1: R22.1 R24.1 | length 16.4
  Top Layer w0.2: v1(34.29,-1.397) 33.559,-2.128 33.559,-6.888 33.809,-6.638 33.809,-2.444 35.526,-0.726 35.526,0.021 35.062,0.486 35.062,1.445 R24.1@34.696,1.811
  Bottom Layer w0.2: R22.1@34.265,-0.66 34.29,-0.686 v1(34.29,-1.397)
JTAG2: R36.1 | length 6.6
  Bottom Layer w0.2: 29.559,-6.888 29.809,-6.638 29.809,-1.773 30.175,-1.407 30.175,-0.806 R36.1@30.328,-0.653
  other v1: 30.074,-1.397
JTAG3: R48.1 | length 6.5
  Bottom Layer w0.2: 30.559,-6.888 30.559,-1.979 v1(31.14,-1.397) 31.14,-0.78 R48.1@31.267,-0.653
JTAG4: R104.1 | length 6.5
  Bottom Layer w0.2: 31.559,-6.888 31.809,-6.638 31.809,-1.795 v1(32.207,-1.397) 32.207,-0.755 R104.1@32.309,-0.653
JTAG5: R105.1 | length 6.7
  Bottom Layer w0.2: 32.559,-6.888 32.309,-6.638 32.309,-2.362 v1(33.274,-1.397) 33.274,-0.679 R105.1@33.299,-0.653
Kom_PG: R102.1 U4.24 U16.5 | length 47.7
  Top Layer w0.2: v1(66.421,41.478) 66.454,41.511 68.263,41.511 U4.24@68.295,41.544
  Top Layer w0.3: U16.5@29.083,33.996 31.318,33.996 ; R102.1@31.362,33.274 31.318,33.318 31.318,33.996 ; v1(33.299,33.35) 32.654,33.996 31.318,33.996
  Layer 3 w0.2: v1(65.938,35.179) 65.921,35.196 65.921,41.035 66.364,41.478 v1(66.421,41.478)
  Layer 4 w0.2: v1(33.299,33.35) 39.7,33.35 41.377,35.027 42.201,35.027 42.675,35.501 45.907,35.501 46.729,34.679 65.439,34.679 v1(65.938,35.179)
LMK_CLKin0_N: C223.2 U9.32 | length 47.3
  Layer 3 w0.097: v1(15.977,55.987) cw(c16.153,55.987) 16.153,56.163 17.014,56.163 cw(c17.014,55.245) 17.932,55.245 17.932,51.341 ccw(c20.117,51.341) 20.117,49.157 28.727,49.157 cw(c28.727,46.617) 31.267,46.617 31.267,33.299 ccw(c34.105,33.299) 34.105,30.462 35.324,30.462 cw(c35.324,29.743) 36.043,29.743 36.043,29.107 36.038,29.103 36.038,28.554 35.862,28.378 v1(35.862,28.321)
  Bottom Layer w0.112: C223.2@15.1,55.905 15.161,55.967 ccw(c15.084,56.044) 15.193,56.044 cw(c15.303,56.044) 15.225,56.122 cw(c15.307,56.04) 15.307,56.156 15.85,56.156 15.947,56.058 cw(c15.876,55.987) v1(15.977,55.987) ; v1(35.862,28.321) 35.862,28.255 36.03,28.086 36.03,26.646 35.937,26.552 U9.32@35.937,26.372
LMK_CLKin0_P: C224.2 U9.33 | length 47.8
  Layer 3 w0.097: v1(15.977,56.637) ccw(c16.153,56.637) 16.153,56.46 17.014,56.46 cw(c17.014,55.245) 18.23,55.245 18.23,51.341 ccw(c20.117,51.341) 20.117,49.454 28.727,49.454 cw(c28.727,46.617) 31.565,46.617 31.565,33.299 ccw(c34.105,33.299) 34.105,30.759 35.324,30.759 cw(c35.324,29.743) 36.34,29.743 36.34,28.984 36.335,28.979 36.335,28.554 36.512,28.378 v1(36.512,28.321)
  Bottom Layer w0.112: C224.2@15.1,56.718 15.161,56.656 cw(c15.084,56.579) 15.193,56.579 ccw(c15.303,56.579) 15.225,56.502 ccw(c15.307,56.584) 15.307,56.468 15.85,56.468 15.947,56.566 ccw(c15.876,56.637) v1(15.977,56.637) ; U9.33@36.437,26.372 36.437,26.552 36.343,26.646 36.343,28.086 36.512,28.255 v1(36.512,28.321)
LMK_CLKin1_N: C225.2 U9.29 | length 10.6
  Bottom Layer w0.138: U9.29@34.437,26.372 ccw(c34.313,26.496) 34.488,26.496 34.488,26.633 cw(c34.539,26.633) 34.503,26.669 ccw(c34.467,26.705) 34.518,26.705 34.518,27.807 cw(c34.551,28.347) 34.01,28.347 34.01,29.093 cw(c34.551,29.093) 34.518,29.633 34.518,30.734 34.518,30.803 ccw(c34.449,30.803) 34.449,30.872 cw(c34.449,30.94) 34.38,30.94 34.38,31.078 cw(c34.449,31.078) 34.449,31.147 ccw(c34.449,31.215) 34.518,31.215 34.518,31.623 34.518,32.087 cw(c35.941,32.087) 35.941,33.51 36.105,33.51 36.114,33.519 37.511,33.519 ccw(c37.511,33.777) C225.2@37.694,33.595 ; C225.2@37.694,33.595 37.77,33.67 C225.2@37.77,33.68
LMK_CLKin1_P: C226.2 U9.30 | length 10.6
  Bottom Layer w0.138: U9.30@34.937,26.372 cw(c35.06,26.496) 34.885,26.496 34.885,26.633 ccw(c34.834,26.633) 34.87,26.669 cw(c34.907,26.705) 34.855,26.705 34.855,27.839 ccw(c34.551,27.839) 34.551,28.143 cw(c34.551,28.347) 34.347,28.347 34.347,29.093 cw(c34.551,29.093) 34.551,29.297 ccw(c34.551,29.601) 34.855,29.601 34.855,32.087 cw(c35.941,32.087) 35.941,33.172 36.27,33.172 36.279,33.181 36.855,33.181 36.882,33.181 cw(c36.882,33.113) 36.951,33.113 36.951,32.867 ccw(c37.019,32.867) 37.019,32.798 37.157,32.798 ccw(c37.157,32.867) 37.226,32.867 37.226,33.113 cw(c37.295,33.113) 37.295,33.181 37.363,33.181 37.511,33.181 cw(c37.511,32.923) C226.2@37.694,33.106 ; C226.2@37.694,33.106 37.77,33.03 C226.2@37.77,33.02
LMK_CLKsel: U9.34 U33.12 | length 76
  Top Layer w0.2: v1(20.472,74.878) 20.472,74.945 20.809,75.282 20.809,76.953 U33.12@20.684,77.078
  Layer 3 w0.2: v1(15.24,60.02) 16.889,61.67 16.889,74.172 18.121,75.404 19.234,75.404 19.761,74.878 v1(20.472,74.878)
  Layer 4 w0.2: v1(15.24,60.02) 15.215,59.995 15.215,58.953 8.865,52.603 8.865,47.142 10.922,45.085 17.501,45.085 26.515,36.071 28.186,36.071 32.131,32.125 34.169,32.125 35.173,31.121 35.173,30.435 37.465,28.143 v1(37.465,27.178)
  Bottom Layer w0.3: U9.34@36.937,26.372 36.967,26.402 36.967,26.817 37.172,27.022 37.268,27.022 37.424,27.178 v1(37.465,27.178)
LMK_CLKsel_3.3: U5.25 U33.1 | length 5.5
  Top Layer w0.2: U33.1@20.684,78.677 20.684,78.952 20.937,79.205 20.937,79.421 21.054,79.538 21.731,79.538 v1(21.742,79.527) 23.057,79.527 23.43,79.9 23.873,79.9 24.196,79.578 U5.25@25.234,79.578
LMK_PG_1.8: R109.1 U4.3 U31.5 | length 72
  Top Layer w0.2: U31.5@29.132,26.711 29.282,26.711 29.332,26.661 29.332,26.511 30.404,25.44 v1(30.404,24.206) ; U4.3@70.495,38.044 70.465,38.013 70.465,33.929 v1(72.771,31.623)
  Layer 4 w0.2: v1(27.229,24.206) 27.277,24.254 27.858,23.673 29.87,23.673 v1(30.404,24.206) 30.404,25.855 30.838,26.289 32.709,26.289 33.209,26.789 37.112,26.789 37.248,26.653 40.617,26.653 41.961,27.996 46.282,27.996 47.752,26.526 59.626,26.526 63.368,22.784 v1(66.827,22.784)
  Bottom Layer w0.2: v1(24.282,26.111) 26.187,24.206 v1(27.229,24.206) ; v1(66.827,22.784) 66.827,24.435 68.809,26.416 71.556,26.416 72.771,27.631 v1(72.771,31.623)
Net_IOE0: R25.2 U32.9 | length 14.9
  Top Layer w0.2: U32.9@75.932,19.999 76.343,19.999 77.241,19.101 v1(77.241,18.847)
  Layer 4 w0.2: v1(65.989,20.015) 67.344,21.37 74.972,21.37 77.241,19.101 v1(77.241,18.847)
Net_IOE0_3.3: U5.4 U32.4 | length 88.8
  Top Layer w0.2: U5.4@28.084,76.728 27.999,76.643 27.999,76.049 27.984,76.034 27.984,75.165 v1(28.473,74.676) ; v1(63.043,40.691) 63.043,37.008 71.425,28.626 71.425,22.077 72.495,21.006 72.495,20.682 72.546,20.632 72.546,20.398 72.944,19.999 U32.4@74.282,19.999
  Layer 3 w0.2: v1@28.524,74.676 49.113,74.676 59.353,64.436 59.353,63.786 59.715,63.424 59.715,57.633 63.043,54.305 v1(63.043,40.691)
Net_IOE1: R26.2 U32.10 | length 15.2
  Top Layer w0.2: R26.2@69.85,14.757 69.875,14.732 v1(69.875,14.173) ; U32.10@75.882,20.399 76.766,20.399 77.099,20.066 v1(77.826,20.066)
  Layer 4 w0.2: v1(69.875,14.173) 69.875,14.255 72.149,16.529 77.311,16.529 78.166,17.384 78.166,19.664 77.826,20.005 v1(77.826,20.066)
Net_IOE1_3.3: U5.2 U32.3 | length 101.5
  Top Layer w0.2: v1(26.784,75.429) U5.2@26.784,76.728 ; v1(72.669,23.647) 72.669,21.398 72.895,21.172 72.895,20.848 72.946,20.797 72.946,20.682 73.229,20.399 U32.3@74.282,20.399
  Layer 3 w0.2: v1(66.015,74.168) 66.062,74.12 66.316,74.12 66.319,74.117 68.148,74.117 74.246,68.019 74.246,25.224 v1(72.669,23.647)
  Layer 4 w0.2: v1(26.784,75.429) 27.768,75.429 27.94,75.601 46.071,75.601 47.504,74.168 v1(66.015,74.168)
Net_IOE2: U5.3
NetC1_1: C1.1 R2.2 R3.1 R6.2 | length 2.4
  Bottom Layer w0.165: R6.2@37.77,59.68 cw(c37.806,59.68) 37.806,59.715 C1.1@38.481,59.715 R3.1@39.192,59.715 39.192,60.637 cw(c39.218,60.637) R2.2@39.218,60.662
NetC2_1: C2.1 R3.2 R4.1 | length 1.5
  Bottom Layer w0.165: R4.1@39.192,57.556 39.198,57.556 C2.1@39.198,58.344 39.192,58.344 R3.2@39.192,59.065
NetC3_2: C3.2 R1.1 | length 0.8
  Bottom Layer w0.165: R1.1@39.268,63.19 39.268,63.932 cw(c39.319,63.932) C3.2@39.319,63.983
NetC4_2: C4.2 R5.1 R9.2 | length 4.3
  Top Layer w0.165: v1(38.024,60.655) cw(c38.335,60.655) 38.335,60.966 C4.2@39.675,60.966 41.066,60.966 cw(c41.066,60.655) v1(41.377,60.655)
  Bottom Layer w0.165: R9.2@40.996,60.94 ccw(c41.28,60.94) 41.28,60.655 v1(41.377,60.655)
NetC5_1: C5.1 R8.2 | length 2.1
  Top Layer w0.165: C5.1@39.935,59.055 ccw(c40.29,59.055) 40.29,58.699 v1(41.834,58.699)
NetC5_2: C5.2 R6.1 | length 2
  Top Layer w0.165: v1(37.592,58.725) 39.085,58.725 ccw(c39.085,59.055) C5.2@39.415,59.055
NetC6_2: C6.2 R10.1 | length 0.8
  Bottom Layer w0.165: C6.2@40.056,63.983 40.056,63.241 ccw(c40.107,63.241) R10.1@40.107,63.19
NetC7_2: C7.2 R8.1 R11.2 R12.1 | length 2.4
  Bottom Layer w0.165: R12.1@40.157,59.71 R12.1@40.157,59.721 ; R11.2@40.157,60.67 R12.1@40.157,59.721 ; R8.1@41.58,59.685 40.905,59.685 cw(c40.905,59.721) C7.2@40.869,59.721 R12.1@40.157,59.721
NetC8_2: C8.2 R12.2 R13.1 | length 1.5
  Bottom Layer w0.165: R13.1@40.157,57.549 40.151,57.549 C8.2@40.151,58.344 40.157,58.344 R12.2@40.157,59.06
NetC11_1: C11.1 U2.13 | length 3.3
  Bottom Layer w0.2: U2.13@43.709,98.999 46.43,98.999 46.801,98.628 C11.1@46.806,98.628
NetC12_1: C12.1 U2.11 | length 2.6
  Bottom Layer w0.2: U2.11@44.284,100.074 46.639,100.074 C12.1@46.815,99.898
NetC13_1: C13.1 U2.10 | length 2.7
  Bottom Layer w0.2: U2.10@44.284,100.574 46.335,100.574 46.801,101.041 C13.1@46.806,101.041
NetC14_1: C14.1 U2.6 U2.7 U2.8 U2.9 | length 4.6
  Bottom Layer w0.2: U2.6@43.709,102.649 43.709,102.599 43.784,102.524 44.159,102.524 44.159,102.149 44.234,102.074 U2.7@44.284,102.074 ; U2.9@44.284,101.074 U2.8@44.284,101.574 U2.7@44.284,102.074 ; C14.1@46.815,102.184 46.706,102.074 U2.7@44.284,102.074
NetC21_1: C21.1 J2.2 R39.2 | length 2.5
  Bottom Layer w0.165: C21.1@42.716,121.776 42.709,121.782 R39.2@42.709,122.885 42.717,122.892 J2.2@42.717,124.308
NetC21_2: C21.2 D2.1 | length 1.2
  Bottom Layer w0.165: D2.1@42.708,119.751 42.708,120.989 C21.2@42.716,120.996
NetC22_1: C22.1 D1.5 | length 1
  Bottom Layer w0.165: C22.1@42.717,114.153 42.717,114.684 42.716,114.685 D1.5@42.716,115.138
NetC22_2: C22.2 C23.1 R40.2 | length 2.4
  Bottom Layer w0.165: C23.1@42.717,110.956 42.709,110.963 R40.2@42.709,112.217 42.709,113.365 C22.2@42.717,113.373
NetC23_2: C23.2 FL1.2 | length 1.9
  Bottom Layer w0.165: FL1.2@42.717,108.28 C23.2@42.717,110.176
NetC24_1: C24.1 FL1.5 | length 1.6
  Bottom Layer w0.165: C24.1@42.709,104.559 42.717,104.566 FL1.5@42.717,106.14
NetC24_2: C24.2 U2.4 | length 1.1
  Bottom Layer w0.165: U2.4@42.709,102.649 C24.2@42.709,103.779
NetC25_1: C25.1 U2.15 | length 1
  Bottom Layer w0.165: C25.1@42.709,97.993 U2.15@42.709,98.999
NetC25_2: C25.2 L1.2 R43.2 | length 4.3
  Bottom Layer w0.165: L1.2@42.709,92.955 R43.2@42.709,95.126 C25.2@42.709,97.213
NetC28_1: C28.1 R44.2 U14.1 | length 2.6
  Bottom Layer w0.165: U14.1@42.309,79.847 R44.2@42.309,81.102 C28.1@42.309,82.412
NetC28_2: C28.2 FL2.5 | length 1.8
  Bottom Layer w0.165: C28.2@42.309,83.192 42.309,84.977 FL2.5@42.317,84.985
NetC29_1: C29.1 FL2.2 | length 1.4
  Bottom Layer w0.165: FL2.2@42.317,87.125 C29.1@42.317,88.552
NetC29_2: C29.2 U13.3 | length 1
  Bottom Layer w0.165: U13.3@42.302,90.322 42.302,89.347 C29.2@42.317,89.332
NetC31_2: C31.2 L2.2 R46.1 | length 17.2
  Top Layer w0.2: v1(36.965,88.224) 36.965,84.611 v1(44.284,77.292)
  Bottom Layer w0.2: L2.2@41.097,77.335 C31.2@44.284,77.335
NetC32_2: C32.2 L2.1 R49.2 U14.3 | length 3.8
  Bottom Layer w0.165: U14.3@40.209,78.547 40.217,78.54 L2.1@40.217,77.335 R49.2@40.217,76.022 C32.2@40.217,74.721
NetC37_2: C37.2 U15.4 | length 1.2
  Top Layer w0.2: C37.2@62.398,16.539 62.398,15.38 U15.4@62.424,15.354
NetC39_2: C39.2 U16.7 | length 1.3
  Top Layer w0.2: U16.7@29.083,35.296 30.384,35.296 C39.2@30.395,35.306
NetC44_1: C44.1 R52.1 R53.2 U17.20 | length 21
  Top Layer w0.2: R53.2@18.052,41.199 R53.2@18.055,41.196 ; R52.1@18.055,40.071 R53.2@18.055,41.196 ; U17.20@18.91,23.255 18.941,23.224 19.897,23.224 20.056,23.384 20.056,24.374 20.268,24.586 20.268,26.519 v1(19.787,27) ; C44.1@19.05,41.173 18.078,41.173 R53.2@18.055,41.196
  Layer 3 w0.2: v1(18.059,40.03) 18.059,39.963 18.263,39.76 v1(18.263,29.032)
  Layer 4 w0.2: v1(18.263,29.032) 19.787,27.508 v1(19.787,27)
NetC49_1: C49.1 U17.25 | length 2.1
  Top Layer w0.2: U17.25@17.26,24.905 17.26,25.61 17.8,26.15 17.8,26.668 C49.1@17.852,26.72
NetC50_1: C50.1 R54.1 R55.1 U17.22 | length 15.7
  Top Layer w0.2: U17.22@18.91,24.255 v1(19.743,25.089) ; v1(18.923,33.731) 19.507,33.731 20.218,33.02 21.006,33.02 R55.1@21.133,33.147 21.259,33.021 C50.1@24.091,33.021
  Layer 3 w0.2: v1(18.923,33.731) 18.923,27.121 19.743,26.301 v1(19.743,25.089)
NetC54_2: C54.2 U17.12 U17.13 U17.14 U17.15 | length 5
  Top Layer w0.2: U17.12@17.26,20.105 U17.13@17.76,20.105 U17.14@18.26,20.105 C54.2@20.193,20.091 ; U17.15@18.91,20.755 19.135,20.755 19.627,20.264 20.259,20.264 20.559,19.964 C54.2@20.559,19.914
NetC55_1: C55.1 R56.1 R58.1 U17.21 | length 20.2
  Top Layer w0.2: R58.1@7.758,36.581 7.758,35.408 v1(7.814,35.352) 7.874,35.292 C55.1@9.075,35.292 ; U17.21@18.91,23.755 18.935,23.78 18.966,23.749 v1(19.507,23.749)
  Bottom Layer w0.2: v1(7.814,35.352) 7.814,34.427 18.492,23.749 v1(19.507,23.749)
NetC61_1: C61.1 R59.2 R60.1 U17.19 | length 9.4
  Top Layer w0.2: U17.19@18.91,22.755 19.739,22.755 v1(19.812,22.682) ; v1(20.015,17.424) 20.015,16.713 R60.1@20.041,16.688 20.084,16.644 R59.2@20.084,15.69 C61.1@21.024,15.69
  Layer 3 w0.2: v1(19.812,22.682) 20.489,22.005 20.489,20.413 20.015,19.939 v1(20.015,17.424)
NetC66_1: C66.1 R61.1 R62.2 U19.6 | length 4
  Top Layer w0.2: U19.6@14.251,81.911 R61.1@15.82,81.911 ; R62.2@15.82,83.167 R61.1@15.82,81.911 ; C66.1@16.963,81.774 15.956,81.774 R61.1@15.82,81.911
NetC66_2: C66.2 C67.2 C68.2 FB2.1 FB3.1 R61.2 U19.5 | length 42.8
  Top Layer w0.5: C67.2@13.503,77.648 C67.2@13.64,77.785 ; C68.2@13.514,79.104 13.728,78.89 13.728,78.005 C67.2@13.599,77.876 ; C68.2@13.575,79.35 13.875,79.65 13.875,80.086 14.201,80.413 14.201,81.011 14.251,81.061 15.77,81.061 R61.2@15.82,81.011 15.828,81.003 16.955,81.003 C66.2@16.963,80.994 16.963,80.999 16.983,81.019 16.983,81.049 17.419,81.049 17.683,81.313 17.683,88.092 32.24,102.649 v1(33.913,102.649)
  Bottom Layer w0.5: FB2.1@34.437,104.796 34.437,104.776 33.489,103.828 33.489,103.073 v1(33.913,102.649) FB3.1@37.775,102.649
NetC71_2: C71.2 U19.1 | length 2.4
  Top Layer w0.2: C71.2@8.924,82.461 8.924,83.193 9.242,83.511 U19.1@10.451,83.511
NetC72_1: C72.1 R63.1 R64.2 U21.6 | length 5.1
  Top Layer w0.2: R64.2@8.957,69.089 8.986,69.06 C72.1@10.031,69.06 ; R63.1@9.905,70.154 9.905,69.185 C72.1@10.031,69.06 ; U21.6@10.001,66.238 10.001,67.951 9.994,67.958 9.994,69.022 C72.1@10.031,69.06
NetC72_2: C72.2 C73.2 C74.2 FB1.1 R63.2 U21.5 | length 55.6
  Top Layer w0.3: FB1.1@46.883,89.083 FB1.1@46.883,89.103
  Top Layer w0.5: U21.5@10.801,66.238 10.801,67.935 10.786,67.95 10.786,69.04 10.806,69.06 C72.2@10.811,69.06 R63.2@10.805,70.154 ; C74.2@12.725,70.139 R63.2@10.805,70.154 ; v1(13.056,76.175) 13.056,76.149 10.786,73.88 C73.2@10.786,71.384 R63.2@10.805,70.154 ; FB1.1@46.883,89.103 48.183,89.103 v1(48.235,89.154)
  Layer 3 w0.5: v1(13.056,76.175) 24.006,87.125 47.51,87.125 48.184,87.799 v1@48.184,89.205
NetC75_2: C75.2 U21.1 | length 1.7
  Top Layer w0.3: U21.1@8.401,62.438 8.401,60.748 C75.2@8.417,60.731
NetC77_2: C77.2 FB4.1 R65.2 U22.10 U22.11 U22.12 U22.13 U22.14 | length 8.1
  Top Layer w0.3: U22.14@31.764,60.999 U22.13@32.414,60.999 32.414,60.874 34.145,60.874 C77.2@34.27,60.749 R65.2@34.27,59.499 ; U22.10@33.114,58.999 U22.11@33.114,59.649 ; U22.12@33.114,60.299 U22.11@33.114,59.649 ; FB4.1@35.637,60.165 35.587,60.165 35.02,59.597 34.377,59.597 R65.2@34.27,59.49 R65.2@34.27,59.499 ; U22.11@33.114,59.649 34.12,59.649 R65.2@34.27,59.499
NetC79_2: C79.2 U22.7 | length 1.3
  Top Layer w0.2: U22.7@31.764,57.649 31.764,56.445 C79.2@31.809,56.4
NetC82_2: C82.2 FB10.1 R67.2 U23.10 U23.11 U23.12 U23.13 U23.14
NetC84_2: C84.2 U23.7 | length 1.5
  Top Layer w0.2: C84.2@19.558,60.748 19.574,60.732 21.001,60.732 U23.7@21.017,60.716
NetC85_2: C85.2 FB12.1 R69.2 U24.10 U24.11 U24.12 U24.13 U24.14
NetC87_2: C87.2 U24.7 | length 1.3
  Top Layer w0.2: U24.7@58.527,49.503 58.536,49.512 58.536,50.103 58.699,50.267 C87.2@58.699,50.74
NetC92_1: C92.1 R71.1 R72.2 U25.3 | length 3.8
  Top Layer w0.2: C92.1@27.371,45.593 27.483,45.705 R71.1@27.483,46.838 27.559,46.914 R72.2@28.449,46.914 28.499,46.914 28.699,47.114 28.699,47.581 28.825,47.707 U25.3@28.825,48.224
NetC92_2: C92.2 C96.2 C97.2 C98.2 FB13.1 R71.2 U25.1 U25.2 | length 6.2
  Top Layer w0.5: C97.2@28.574,44.239 28.574,44.003 29.237,43.339 31.182,43.339 32.039,44.196 FB13.1@33.934,44.196
NetC126_1: C126.1 R73.1 R74.2 U27.3 | length 5.1
  Top Layer w0.3: R74.2@48.017,52.487 48.031,52.502 48.031,53.088 48.669,53.726 49.657,53.726 C126.1@49.784,53.853 ; 49.784,52.832 C126.1@49.784,53.853 ; R73.1@50.16,55.14 50.025,55.005 50.025,54.094 C126.1@49.89,53.959 C126.1@49.784,53.853
NetC126_2: C126.2 C128.2 C129.2 C130.2 FB14.1 R73.2 U27.1 U27.2 | length 11.5
  Top Layer w0.3: U27.2@50.288,52.614 U27.1@50.788,52.614 ; R73.2@51.06,55.14 51.1,55.1 51.1,53.999 C126.2@51.14,53.959 51.14,52.967 U27.1@50.788,52.614 ; v1(52.146,53.01) FB14.1@52.146,52.262 ; v1(53.67,52.959) 53.67,52.341 C129.2@53.749,52.262 ; v1(55.143,52.934) 55.143,52.332 C130.2@55.213,52.262 ; C128.2@56.617,51.859 56.617,51.864 56.219,52.262 C130.2@55.213,52.262 ; U27.1@50.788,52.614 51.744,52.614 52.096,52.262 FB14.1@52.146,52.262 ; FB14.1@52.146,52.262 C129.2@53.749,52.262 ; C129.2@53.749,52.262 C130.2@55.213,52.262
NetC142_1: C142.1 R75.1 R76.2 U28.3 | length 3.5
  Top Layer w0.2: U28.3@27.808,53.865 28.283,53.865 28.358,53.94 28.688,53.94 C142.1@28.988,54.24 29.234,53.994 R75.1@30.081,53.994 30.181,53.894 R76.2@31.014,53.894
NetC142_2: C142.2 C143.2 C144.2 C145.2 L8.1 R75.2 U28.1 U28.2 | length 3.1
  Top Layer w0.3: U28.2@27.808,53.365 U28.1@27.808,52.865 27.833,52.89 28.888,52.89 C142.2@28.988,52.99 29.04,53.042 30.029,53.042 R75.2@30.081,53.094 30.081,53.067 R75.2@30.231,52.917
NetC170_2: C170.2 U29.4 | length 1.1
  Top Layer w0.2: C170.2@34.011,33.24 34.112,33.341 34.962,33.341 35.012,33.391 U29.4@35.012,33.442
NetC171_1: C171.1 R77.1 | length 8.1
  Top Layer w0.2: v1(47.142,22.936) 47.864,22.936 C171.1@47.991,22.809
  Bottom Layer w0.2: R77.1@42.672,27.457 v1(43.663,27.457) 46.101,25.019 46.101,23.495 46.617,22.979 47.1,22.979 v1(47.142,22.936)
NetC172_1: C172.1 R78.1 | length 1.4
  Top Layer w0.2: R78.1@44.842,18.263 46.263,18.263 C172.1@46.279,18.278
NetC173_1: C173.1 U9.5 | length 6.3
  Top Layer w0.2: v1(39.446,17.17) 39.87,17.594 41.899,17.594 42.374,17.119 43.749,17.119 C173.1@43.749,17.069
  Bottom Layer w0.2: U9.5@38.937,18.572 38.966,18.542 38.966,17.65 v1(39.446,17.17)
NetC175_2: C175.2 R90.1 | length 0.9
  Bottom Layer w0.165: R90.1@49.454,28.778 49.603,28.927 C175.2@50.338,28.927
NetC176_1: C176.1 R79.1 R90.2 | length 2.2
  Bottom Layer w0.165: C176.1@47.388,28.887 48.445,28.887 R90.2@48.554,28.778 48.556,28.776 R79.1@48.556,27.82
NetC177_2: C177.2 R89.2 X1.1 | length 40.2
  Layer 4 w0.3: v1(48.641,35.204) 64.846,35.204 65.735,36.093 66.7,36.093 68.114,34.68 74.184,34.68 v1(75.514,33.35)
  Bottom Layer w0.3: R89.2@48.184,34.149 48.641,34.606 v1(48.641,35.204) ; X1.1@75.535,33.371 78.359,30.548 78.359,26.594 77.729,25.964 76.193,25.964 76.073,25.844 C177.2@76.073,25.839
NetC178_2: C178.2 R91.1 | length 0.9
  Bottom Layer w0.165: R91.1@49.454,29.739 49.604,29.589 C178.2@50.338,29.589
NetC179_1: C179.1 R84.2 R91.2 | length 2.2
  Bottom Layer w0.165: C179.1@47.388,29.624 48.438,29.624 R91.2@48.554,29.739 48.556,29.742 R84.2@48.556,30.69
NetC209_2: C209.2 C210.2 FB26.2 X1.6 | length 39.8
  Top Layer w0.165: FB26.2@44.831,32.08 47.117,32.08 v1(47.676,31.521)
  Layer 4 w0.174: v1(47.676,31.521) 48.475,31.521 49.343,30.654 60.315,30.654 62.275,32.614 v1(64.313,32.614)
  Bottom Layer w0.165: v1(64.313,32.614) 64.39,32.614 64.454,32.678 70.293,32.678 X1.6@71.111,33.496 71.46,33.147 73.204,33.147 73.279,33.072 73.279,26.162 73.593,25.848 C210.2@74.498,25.848 74.642,25.705 75.076,25.705 75.286,25.914 C209.2@75.286,26.175
NetC219_2: C219.2 FB30.1 R86.2 U31.10 U31.11 U31.12 U31.13 U31.14
NetC221_1: C221.1 U31.7 | length 3.3
  Top Layer w0.5: U31.7@29.132,28.011 29.182,28.061 29.711,28.061 30.408,28.758 30.408,29.467 30.676,29.735 31.247,29.735 31.267,29.755 C221.1@31.267,29.76
NetC230_2: C230.2 U18.6 | length 1.3
  Top Layer w0.2: C230.2@4.494,6.063 4.494,6.058 4.749,5.804 U18.6@5.701,5.804
NetC231_2: C231.2 U20.6 | length 1.7
  Top Layer w0.2: C231.2@5.603,11.604 5.773,11.434 6.003,11.434 6.55,10.887 6.674,10.887 6.849,10.712 U20.6@6.974,10.712
NetC232_1: C232.1 R41.2 T2.4 | length 3.9
  Top Layer w0.165: v1(20.98,24.021) 21.495,24.021 ccw(c21.495,24.743) T2.4@22.217,24.743
  Bottom Layer w0.165: C232.1@20.812,21.819 20.812,23.852 cw(c20.98,23.852) v1(20.98,24.021)
NetC232_2: C232.2 R57.2 U17.17 | length 1.1
  Top Layer w0.165: U17.17@18.917,21.763 U17.17@18.91,21.755 v1(19.89,21.755) R57.2@19.979,21.844
NetC238_2: C238.2 R131.1 R134.1 U8.1 | length 21.2
  Top Layer w0.3: U8.1@65.971,10.399 67.055,10.399 67.259,10.603 C238.2@67.259,10.608 67.259,10.613 67.379,10.733 67.644,10.733 68.58,11.669 v1(68.58,14.148)
  Layer 3 w0.3: v1(68.58,14.148) 69.18,14.748 69.942,14.748 74.26,19.066 74.26,22.26 73.939,22.581 v1(73.939,24.155)
  Layer 4 w0.3: v1(73.939,24.155) 76.032,24.155 76.363,23.825 v1(76.403,23.825)
NetC240_1: C240.1 R101.1 R131.2 U32.13 | length 2.9
  Top Layer w0.2: C240.1@75.54,22.778 C240.1@75.55,22.778 ; U32.13@75.682,21.799 75.682,22.645 C240.1@75.55,22.778 ; R101.1@77.343,22.943 77.325,22.925 R131.2@76.403,22.925 76.256,22.778 C240.1@75.55,22.778
NetC242_1: C242.1 R134.2 R135.1 U33.13 | length 4
  Top Layer w0.2: U33.13@21.284,77.327 21.284,76.067 v1(21.412,75.939)
  Top Layer w0.3: v1(21.412,75.939) R134.2@22.403,75.939
  Layer 4 w0.3: v1(20.066,75.486) 20.959,75.486 v1(21.412,75.939)
NetD1_2: D1.2 D2.6 R99.2 | length 2.2
  Bottom Layer w0.165: D1.2@42.716,116.338 R99.2@42.716,117.423 ; R99.2@42.717,117.424 42.708,117.424 42.708,118.551 D2.6@42.716,118.551
NetD3_1: D3.1 L3.1 U17.5 | length 13.6
  Top Layer w0.3: 13.322,22.03 14.001,22.03 14.226,22.255 U17.5@15.11,22.255
  Top Layer w0.5: L3.1@6.345,19.055 8.42,19.055 11.395,22.03 13.322,22.03
  Top Layer w2: D3.1@6.083,15.733 6.083,18.98 6.158,19.055 L3.1@6.345,19.055
NetD3_2: D3.2 U17.6 | length 14.6
  Top Layer w0.3: 13.322,21.33 14.008,21.33 14.408,21.731 15.085,21.731 U17.6@15.11,21.755
  Top Layer w0.5: D3.2@6.083,13.382 7.334,13.382 7.988,14.035 7.988,15.837 10.88,18.729 10.88,20.526 11.685,21.33 13.322,21.33
NetD4_1: D4.1 L5.1 U17.2 | length 14.9
  Top Layer w0.3: 13.993,24.098 14.31,23.78 U17.2@15.11,23.78
  Top Layer w0.5: 13.993,24.098 13.701,24.389 13.701,28.406 15.201,29.906 D4.1@15.201,29.971
  Top Layer w2: L5.1@11.53,34.987 11.53,32.912 14.135,30.306 14.931,30.306 15.201,30.036 D4.1@15.201,29.971
NetD4_2: D4.2 U17.1 | length 4
  Top Layer w0.3: 14.401,25.155 14.401,24.789 U17.1@14.91,24.28
  Top Layer w0.5: 14.401,25.155 14.401,26.82 14.816,27.235 14.816,27.489 14.947,27.62 D4.2@15.201,27.62
NetD5_1: D5.1 L6.1 U17.4 | length 12.9
  Top Layer w0.3: 13.355,22.755 U17.4@15.11,22.755
  Top Layer w0.5: D5.1@10.629,26.492 11.649,25.472 11.649,23.158 11.872,22.936 13.175,22.936 13.355,22.755
  Top Layer w2: L6.1@5.168,26.322 5.243,26.397 10.534,26.397 D5.1@10.629,26.492
NetD5_2: D5.2 U17.3 | length 8.7
  Top Layer w0.3: 13.67,23.431 13.82,23.28 15.085,23.28 U17.3@15.11,23.255
  Top Layer w0.5: D5.2@10.629,28.843 10.76,28.712 11.651,28.712 12.875,27.488 12.875,24.226 13.67,23.431
NetD6_1: D6.1 L7.1 U17.7 | length 9.8
  Top Layer w0.3: 13.605,20.467 13.968,20.83 14.215,20.83 14.615,21.231 14.732,21.231
  Top Layer w0.5: L7.1@13.605,15.519 13.605,20.467
  Top Layer w2: D6.1@10.629,15.189 13.53,15.189 13.605,15.264 L7.1@13.605,15.659
NetD6_2: D6.2 U17.8 | length 13.9
  Top Layer w0.5: D6.2@10.629,12.838 10.883,12.838 11.961,11.76 14.707,11.76 15.443,12.497 15.443,18.821 14.985,19.279 14.985,20 15.01,20.025 U17.8@15.01,20.63
NetD7_1: D7.1 R100.1 | length 1.3
  Top Layer w0.2: R100.1@17.831,4.376 17.856,4.351 D7.1@17.856,3.112
NetD8_1: D8.1 R132.1 | length 1.4
  Top Layer w0.3: D8.1@63.678,6.96 R132.1@63.678,8.313
NetD9_1: D9.1 R133.1 | length 1.4
  Top Layer w0.3: R133.1@14.877,3.15 14.896,3.131 16.212,3.131 D9.1@16.231,3.112
NetJ1_2: J1.2 R39.1 | length 3.2
  Bottom Layer w0.165: J1.2@38.57,122.885 R39.1@41.809,122.885
NetJ3_2: J3.2 R40.1 | length 4.4
  Bottom Layer w0.165: R40.1@43.609,112.217 J3.2@47.966,112.217
NetJ4_2: J4.2 R99.1 | length 4.3
  Bottom Layer w0.165: R99.1@43.617,117.424 J4.2@47.966,117.424
NetJ7_2: J7.2 R43.1 | length 2.5
  Bottom Layer w0.165: R43.1@43.609,95.126 J7.2@46.074,95.126